# Altium PCB ESP32-C3FH4-v1.2.PcbDoc (part 2 of 2)
Units mil, origin at the board's own origin, x right, y up, seen from the top; angles counter-clockwise.
Board outline 1418.46 x 1854.93 mil, 4 copper layers (Top Layer, GND, POWER, Bottom Layer), stack 30.634 mil thick; 59 components, 45 nets, 255 pads, 118 vias.
Unrouted connection lines stored in the file: 2.
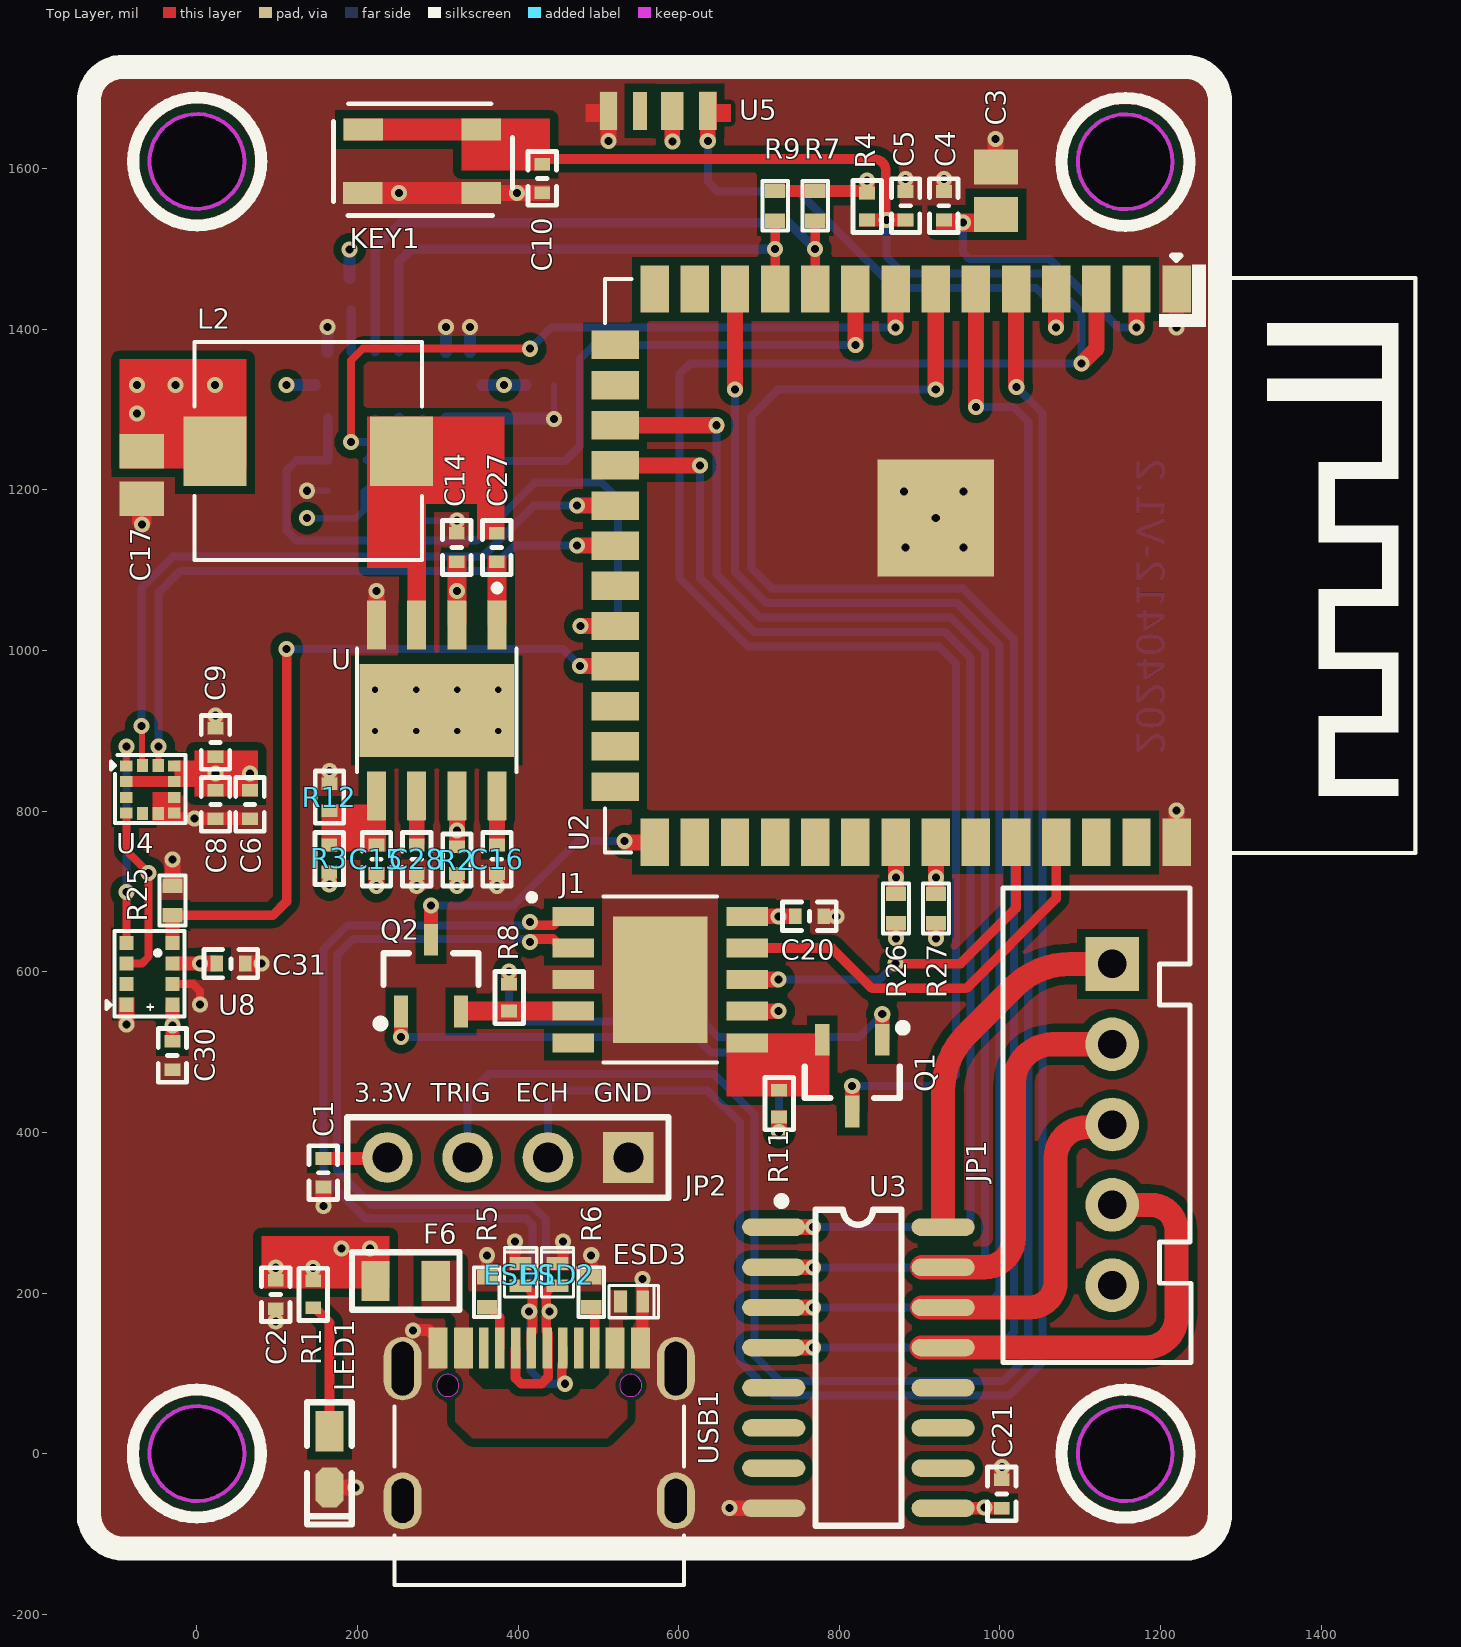
[diagram p0: Top Layer view]

## Silkscreen, mask and mechanical layers (free items; w line width, h text height) (continued)
Dimensions: (continued)
  text "POWER" at -29.51,3775 h60
  text "0.036mm" at 1760,3775 h60
  text "Dielectric 2" at -29.51,3655 h60
  text "0.254mm" at 1760,3655 h60
  text "4.2" at 2409.84,3655 h60
  text "4" at -439.42,3535 h60
  text "Bottom Layer" at -29.51,3535 h60
  text "0.036mm" at 1760,3535 h60
  text "Bottom Solder" at -29.51,3415 h60
  text "Solder Resist" at 900.23,3415 h60
  text "0.010mm" at 1760,3415 h60
  text "3.5" at 2409.84,3415 h60
  text "Bottom Overlay" at -29.51,3295 h60
  text "Total board thickness:" at -439.42,3175 h60
  text "0.798mm" at 1760,3175 h60
Drill Drawing:
  circle w10: c1980.62,2237.28 r33.33
  lines w10: 1947.29,1603.94 1947.29,1620.61 1963.96,1637.28 1947.29,1653.94 1947.29,1670.61 1963.96,1670.61 1980.62,1653.94 1997.29,1670.61 2013.96,1670.61 2013.96,1653.94 1997.29,1637.28 2013.96,1620.61 2013.96,1603.94 1997.29,1603.94 1980.62,1620.61 1963.96,1603.94 1947.29,1603.94 ; 1947.29,1753.94 2013.96,1753.94 2013.96,1820.61 1947.29,1820.61 1947.29,1753.94 ; 1947.29,1970.61 2013.96,1970.61 1980.62,1903.94 1947.29,1970.61 ; 1947.29,2070.61 1963.96,2070.61 1963.96,2053.94 1997.29,2053.94 1997.29,2070.61 2013.96,2070.61 2013.96,2103.94 1997.29,2103.94 1997.29,2120.61 1963.96,2120.61 1963.96,2103.94 1947.29,2103.94 1947.29,2070.61 ; 1947.29,2370.61 1963.96,2370.61 1980.62,2353.94 1997.29,2370.61 2013.96,2370.61 1997.29,2387.28 2013.96,2403.94 1997.29,2403.94 1980.62,2420.61 1963.96,2403.94 1947.29,2403.94 1963.96,2387.28 1947.29,2370.61 ; 1960.62,1767.28 2000.62,1767.28 2000.62,1807.28 1960.62,1807.28 1960.62,1767.28
  lines w15: 1887.5,1558.94 14008.06,1558.94 ; 1887.5,2458.94 14008.06,2458.94 ; 2438.38,1408.94 2438.38,2608.94 ; 3028.22,1408.94 3028.22,2608.94 ; 4127.9,1408.94 4127.9,2608.94 ; 4633.78,1408.94 4633.78,2608.94 ; 5367.58,1408.94 5367.58,2608.94 ; 6867.13,1408.94 6867.13,2608.94 ; 7456.98,1408.94 7456.98,2608.94 ; 8202.78,1408.94 8202.78,2608.94 ; 10442.09,1408.94 10442.09,2608.94 ; 11295.85,1408.94 11295.85,2608.94 ; 12629.46,1408.94 12629.46,2608.94 ; 1887.5,1408.94 14008.06,1408.94 14008.06,2608.94 1887.5,2608.94 1887.5,1408.94
  text "Symbol" at 1977.5,2503.94 h72
  text "Count" at 2483.38,2503.94 h72
  text "Hole Size" at 3073.22,2503.94 h72
  text "Plated" at 4172.9,2503.94 h72
  text "Hole Type" at 4678.78,2503.94 h72
  text "Drill Layer Pair" at 5412.58,2503.94 h72
  text "Via/Pad" at 6912.13,2503.94 h72
  text "Pad Shape" at 7501.98,2503.94 h72
  text "Template" at 8247.78,2503.94 h72
  text "Description" at 10487.09,2503.94 h72
  text "Hole Tolerance (+)" at 11340.85,2503.94 h72
  text "Hole Tolerance (-)" at 12674.46,2503.94 h72
  text "2" at 2483.38,2353.94 h60
  text "27.56mil (0.700mm)" at 3073.22,2353.94 h60
  text "PTH" at 4172.9,2353.94 h60
  text "Slot" at 4678.78,2353.94 h60
  text "Top Layer - Bottom Layer" at 5412.58,2353.94 h60
  text "Pad" at 6912.13,2353.94 h60
  text "Rounded" at 7501.98,2353.94 h60
  text "r120_180h70_140r60m130_190mx130_190p0" at 8247.78,2353.94 h60
  text "2" at 2483.38,2203.94 h60
  text "27.56mil (0.700mm)" at 3073.22,2203.94 h60
  text "PTH" at 4172.9,2203.94 h60
  text "Slot" at 4678.78,2203.94 h60
  text "Top Layer - Bottom Layer" at 5412.58,2203.94 h60
  text "Pad" at 6912.13,2203.94 h60
  text "Rounded" at 7501.98,2203.94 h60
  text "(Mixed)" at 8247.78,2203.94 h60
  text "4" at 2483.38,2053.94 h60
  text "37.40mil (0.950mm)" at 3073.22,2053.94 h60
  text "PTH" at 4172.9,2053.94 h60
  text "Round" at 4678.78,2053.94 h60
  text "Top Layer - Bottom Layer" at 5412.58,2053.94 h60
  text "Pad" at 6912.13,2053.94 h60
  text "(Mixed)" at 7501.98,2053.94 h60
  text "(Mixed)" at 8247.78,2053.94 h60
  text "5" at 2483.38,1903.94 h60
  text "35.43mil (0.900mm)" at 3073.22,1903.94 h60
  text "PTH" at 4172.9,1903.94 h60
  text "Round" at 4678.78,1903.94 h60
  text "Top Layer - Bottom Layer" at 5412.58,1903.94 h60
  text "Pad" at 6912.13,1903.94 h60
  text "(Mixed)" at 7501.98,1903.94 h60
  text "(Mixed)" at 8247.78,1903.94 h60
  text "8" at 2483.38,1753.94 h60
  text "7.87mil (0.200mm)" at 3073.22,1753.94 h60
  text "PTH" at 4172.9,1753.94 h60
  text "Round" at 4678.78,1753.94 h60
  text "Top Layer - Bottom Layer" at 5412.58,1753.94 h60
  text "Pad" at 6912.13,1753.94 h60
  text "Rounded" at 7501.98,1753.94 h60
  text "c30h20" at 8247.78,1753.94 h60
  text "118" at 2483.38,1603.94 h60
  text "10.00mil (0.254mm)" at 3073.22,1603.94 h60
  text "PTH" at 4172.9,1603.94 h60
  text "Round" at 4678.78,1603.94 h60
  text "Top Layer - Bottom Layer" at 5412.58,1603.94 h60
  text "Via" at 6912.13,1603.94 h60
  text "Rounded" at 7501.98,1603.94 h60
  text "(Mixed)" at 8247.78,1603.94 h60
  text "139 Total" at 2483.38,1453.94 h60
  text "Slot definitions :" at 1977.5,1308.97 h60
  text "Routed Path Length" at 3010.19,1308.97 h60
  text "= Calculated from tool start centre position to tool end centre position." at 4112.86,1308.97 h60
  text "Hole Length" at 3010.19,1208.99 h60
  text "= Routed Path Length + Tool Size = Slot length as defined in the PCB layout" at 3702.99,1208.99 h60
Board_outline:
  lines w30: -134.21,-83.02 -134.21,1679.18 ; 1273.84,-72.82 1273.84,1685.57 ; 1273.94,-72.82 1273.94,1685.57 ; -134.51,1681.49 cw(c-92.21,1684.49) -95.21,1726.79 ; -134.51,1681.49 cw(c-92.21,1684.49) -95.21,1726.79 ; -134.51,1681.49 cw(c-92.21,1684.49) -95.21,1726.79 ; -134.51,1681.49 cw(c-92.21,1684.49) -95.21,1726.79 ; -134.21,-82.02 -134.21,1680.18 ; -134.21,-82.02 -134.21,1680.18 ; -134.21,-82.02 -134.21,1680.18 ; -134.21,-78.84 ccw(c-91.91,-75.84) -88.91,-118.14 ; -134.21,-78.84 ccw(c-91.91,-75.84) -88.91,-118.14 ; -134.21,-78.84 ccw(c-91.91,-75.84) -88.91,-118.14 ; -134.21,-78.84 ccw(c-91.91,-75.84) -88.91,-118.14 ; -95.21,1726.77 1231.89,1726.77 ; -95.21,1726.77 1231.89,1726.77 ; -95.21,1726.77 1231.89,1726.77 ; -95.21,1726.77 1231.89,1726.77 ; -88.91,-118.12 1236.19,-118.12 ; -88.91,-118.12 1236.19,-118.12 ; -88.91,-118.12 1236.19,-118.12 ; -88.91,-118.12 1236.19,-118.12 ; 1228.64,1726.59 cw(c1231.64,1684.29) 1273.94,1687.29 ; 1228.64,1726.59 cw(c1231.64,1684.29) 1273.94,1687.29 ; 1228.64,1726.59 cw(c1231.64,1684.29) 1273.94,1687.29 ; 1228.64,1726.59 cw(c1231.64,1684.29) 1273.94,1687.29 ; 1234.44,-118.12 ccw(c1231.44,-75.82) 1273.74,-72.82 ; 1234.44,-118.12 ccw(c1231.44,-75.82) 1273.74,-72.82 ; 1234.44,-118.12 ccw(c1231.44,-75.82) 1273.74,-72.82 ; 1234.44,-118.12 ccw(c1231.44,-75.82) 1273.74,-72.82

## Dimensions
-134.21,1679.18 to 1273.84,1685.57 on Dimensions
1231.89,1726.77 to 1236.19,-118.12 on Dimensions